# Altium PCB hub_usb.PcbDoc (part 1 of 2)
Units mm, origin at the board's own origin, x right, y up, seen from the top; angles counter-clockwise.
Board outline 68.09 x 80.66 mm, 4 copper layers (Top Layer 1, Top Layer, Bottom Layer, Bottom Layer 1), stack 0.603 mm thick; 101 components, 78 nets, 533 pads, 44 vias.
Unrouted connection lines stored in the file: 1.
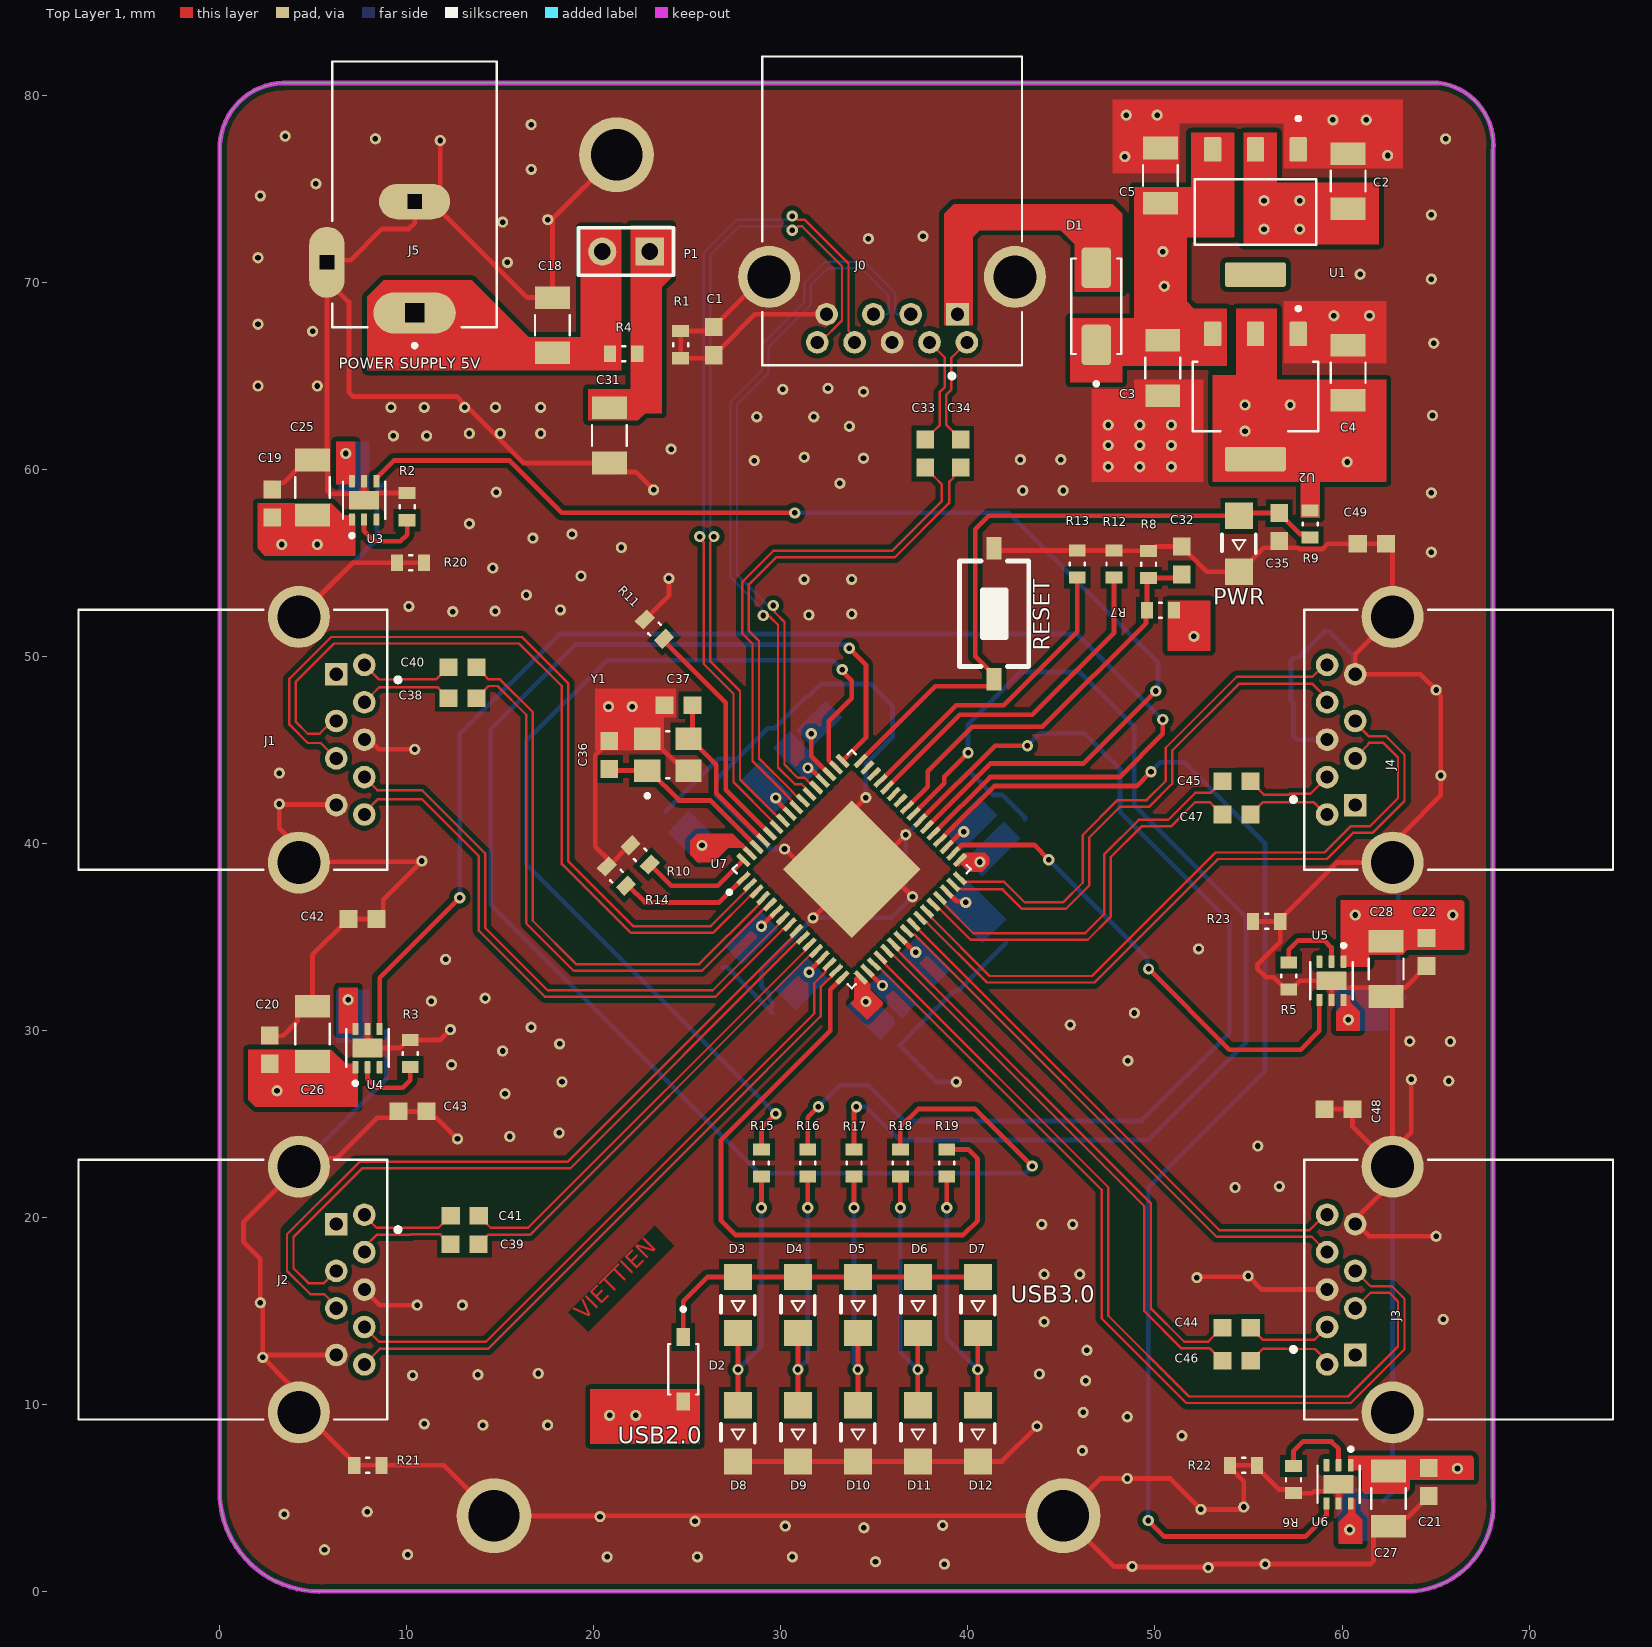
[diagram p0: Top Layer 1 view]
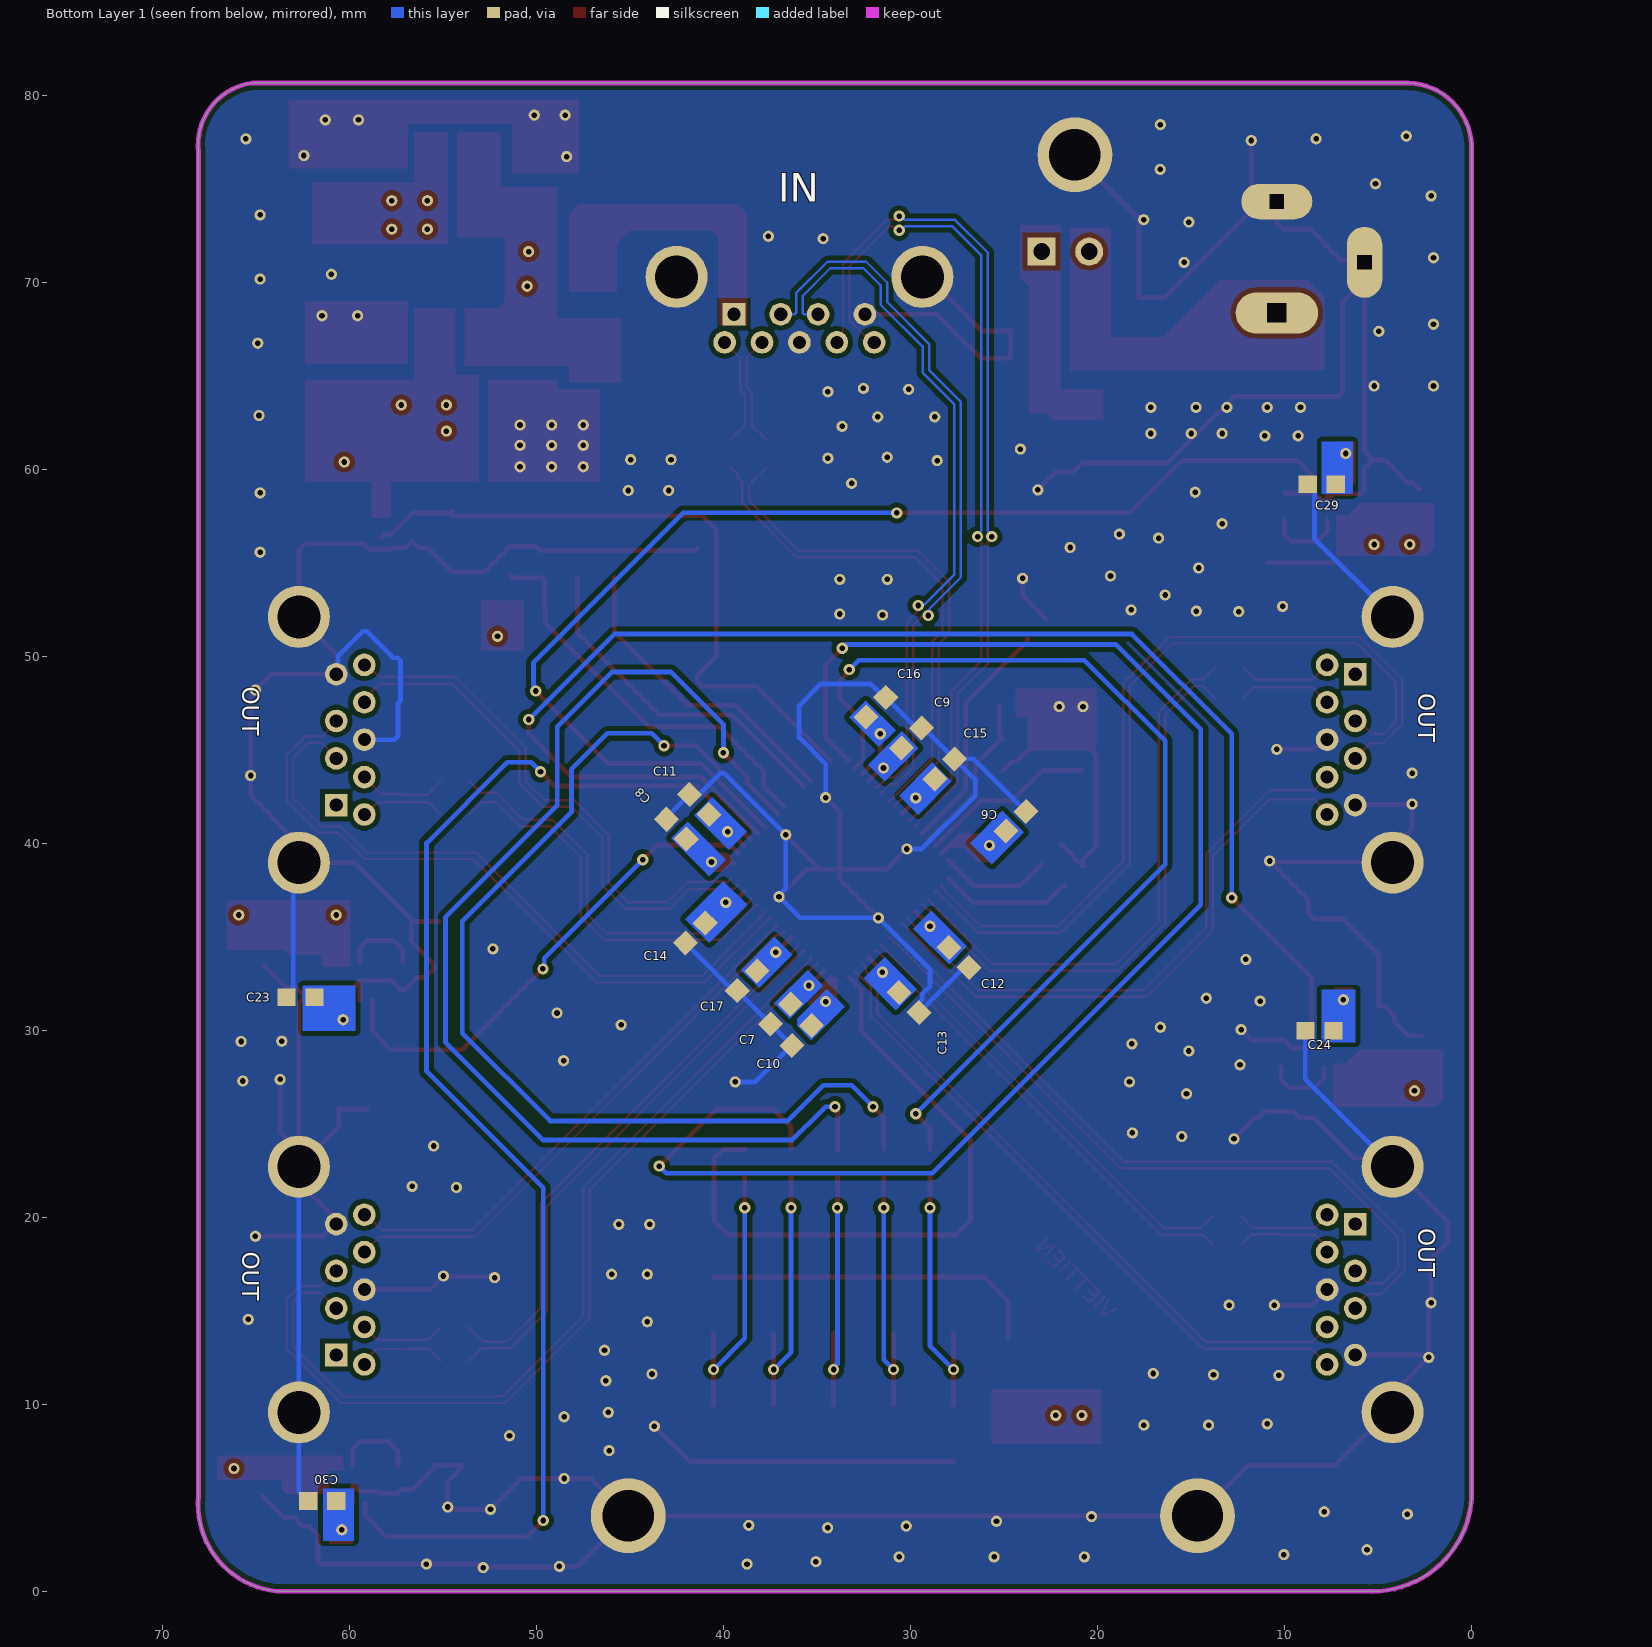
[diagram p1: Bottom Layer 1 view, seen from below]
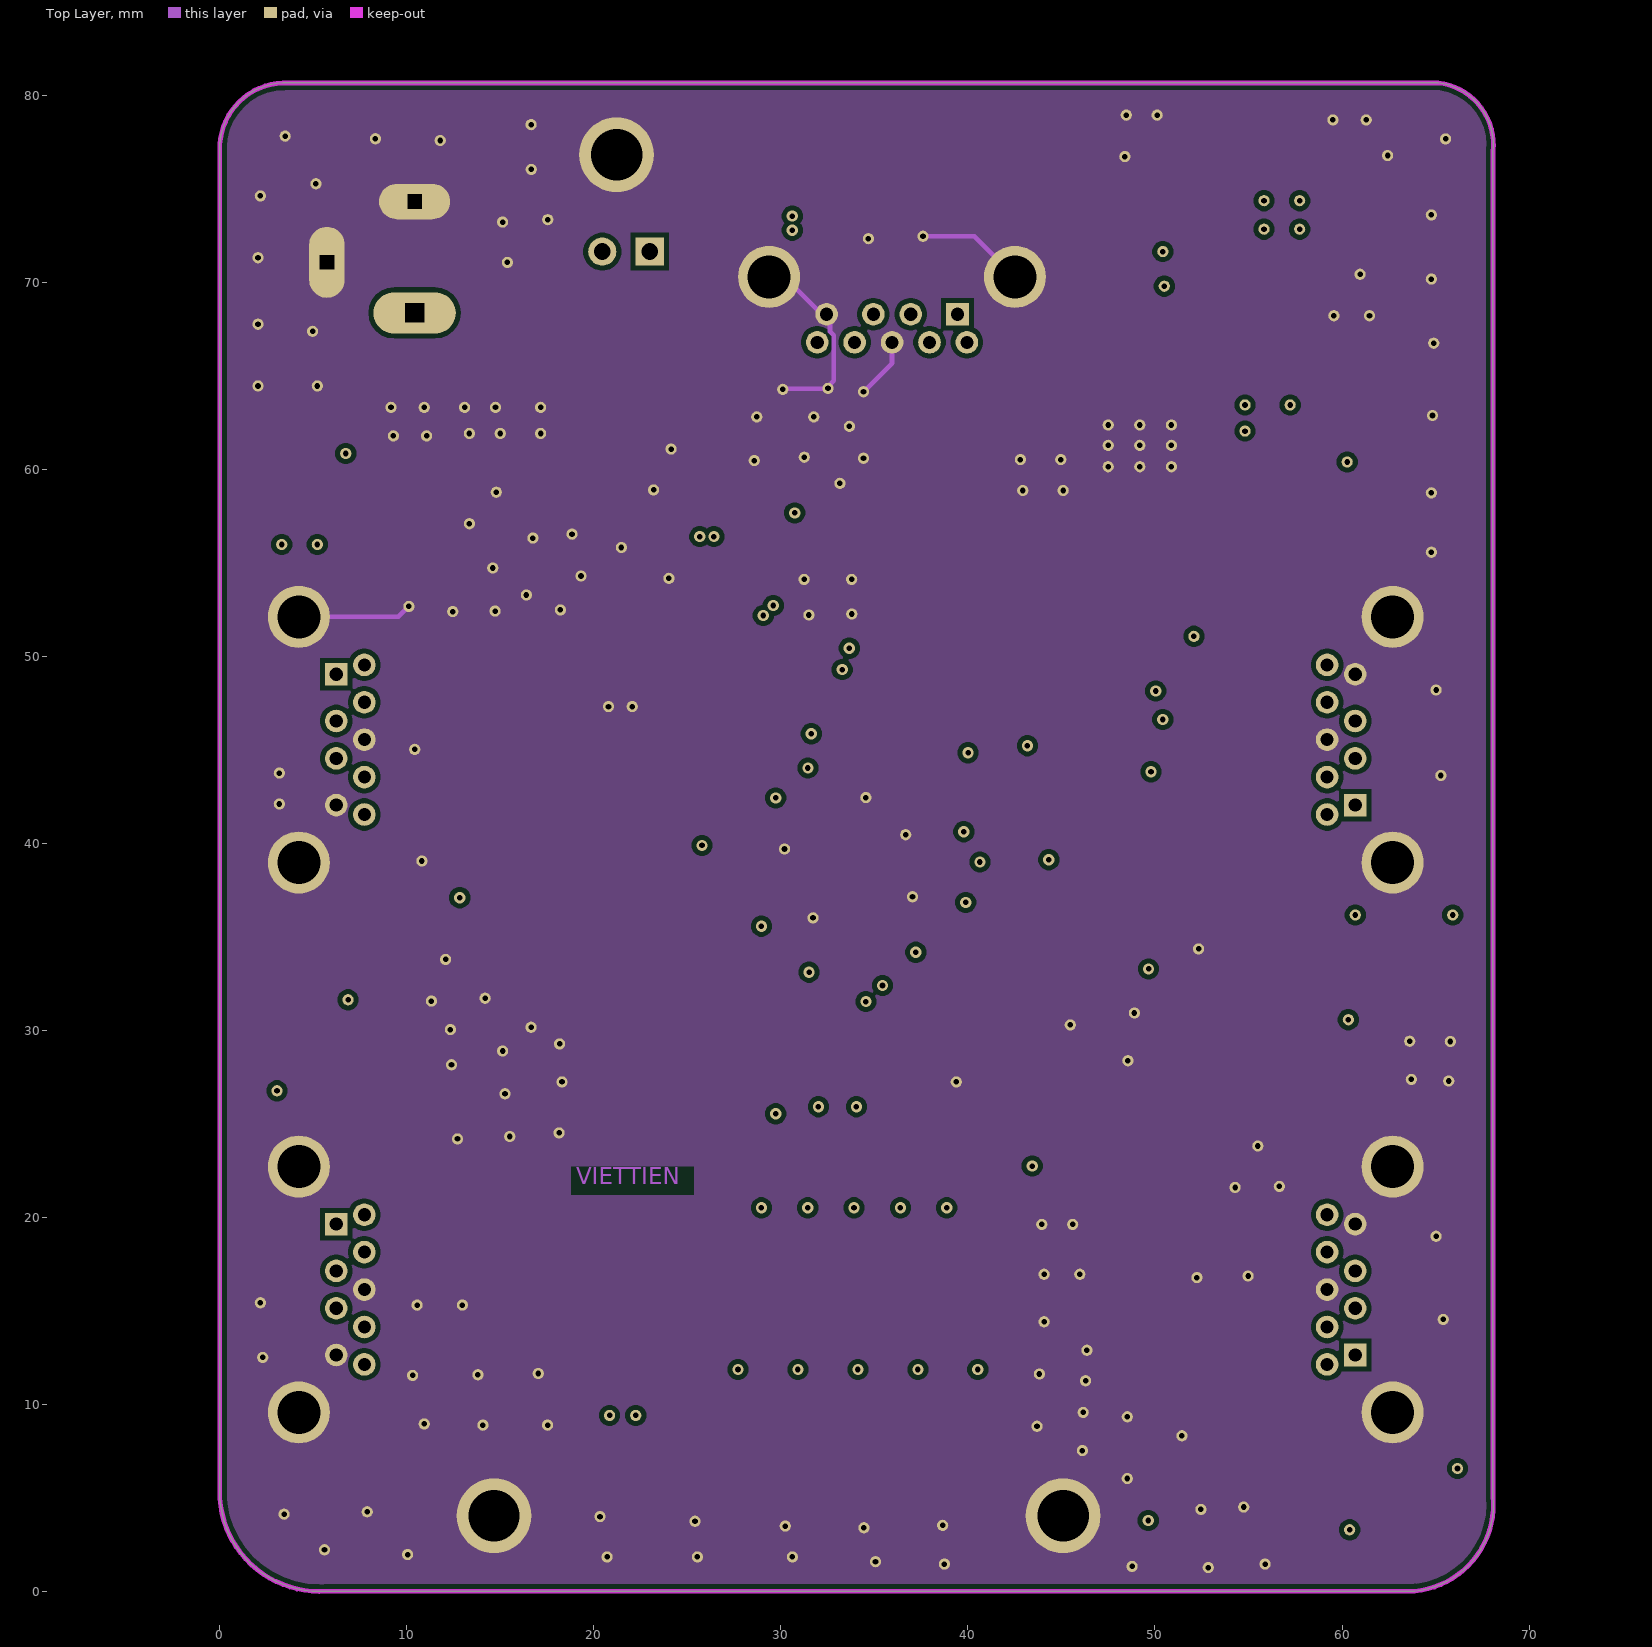
[diagram p2: Top Layer]
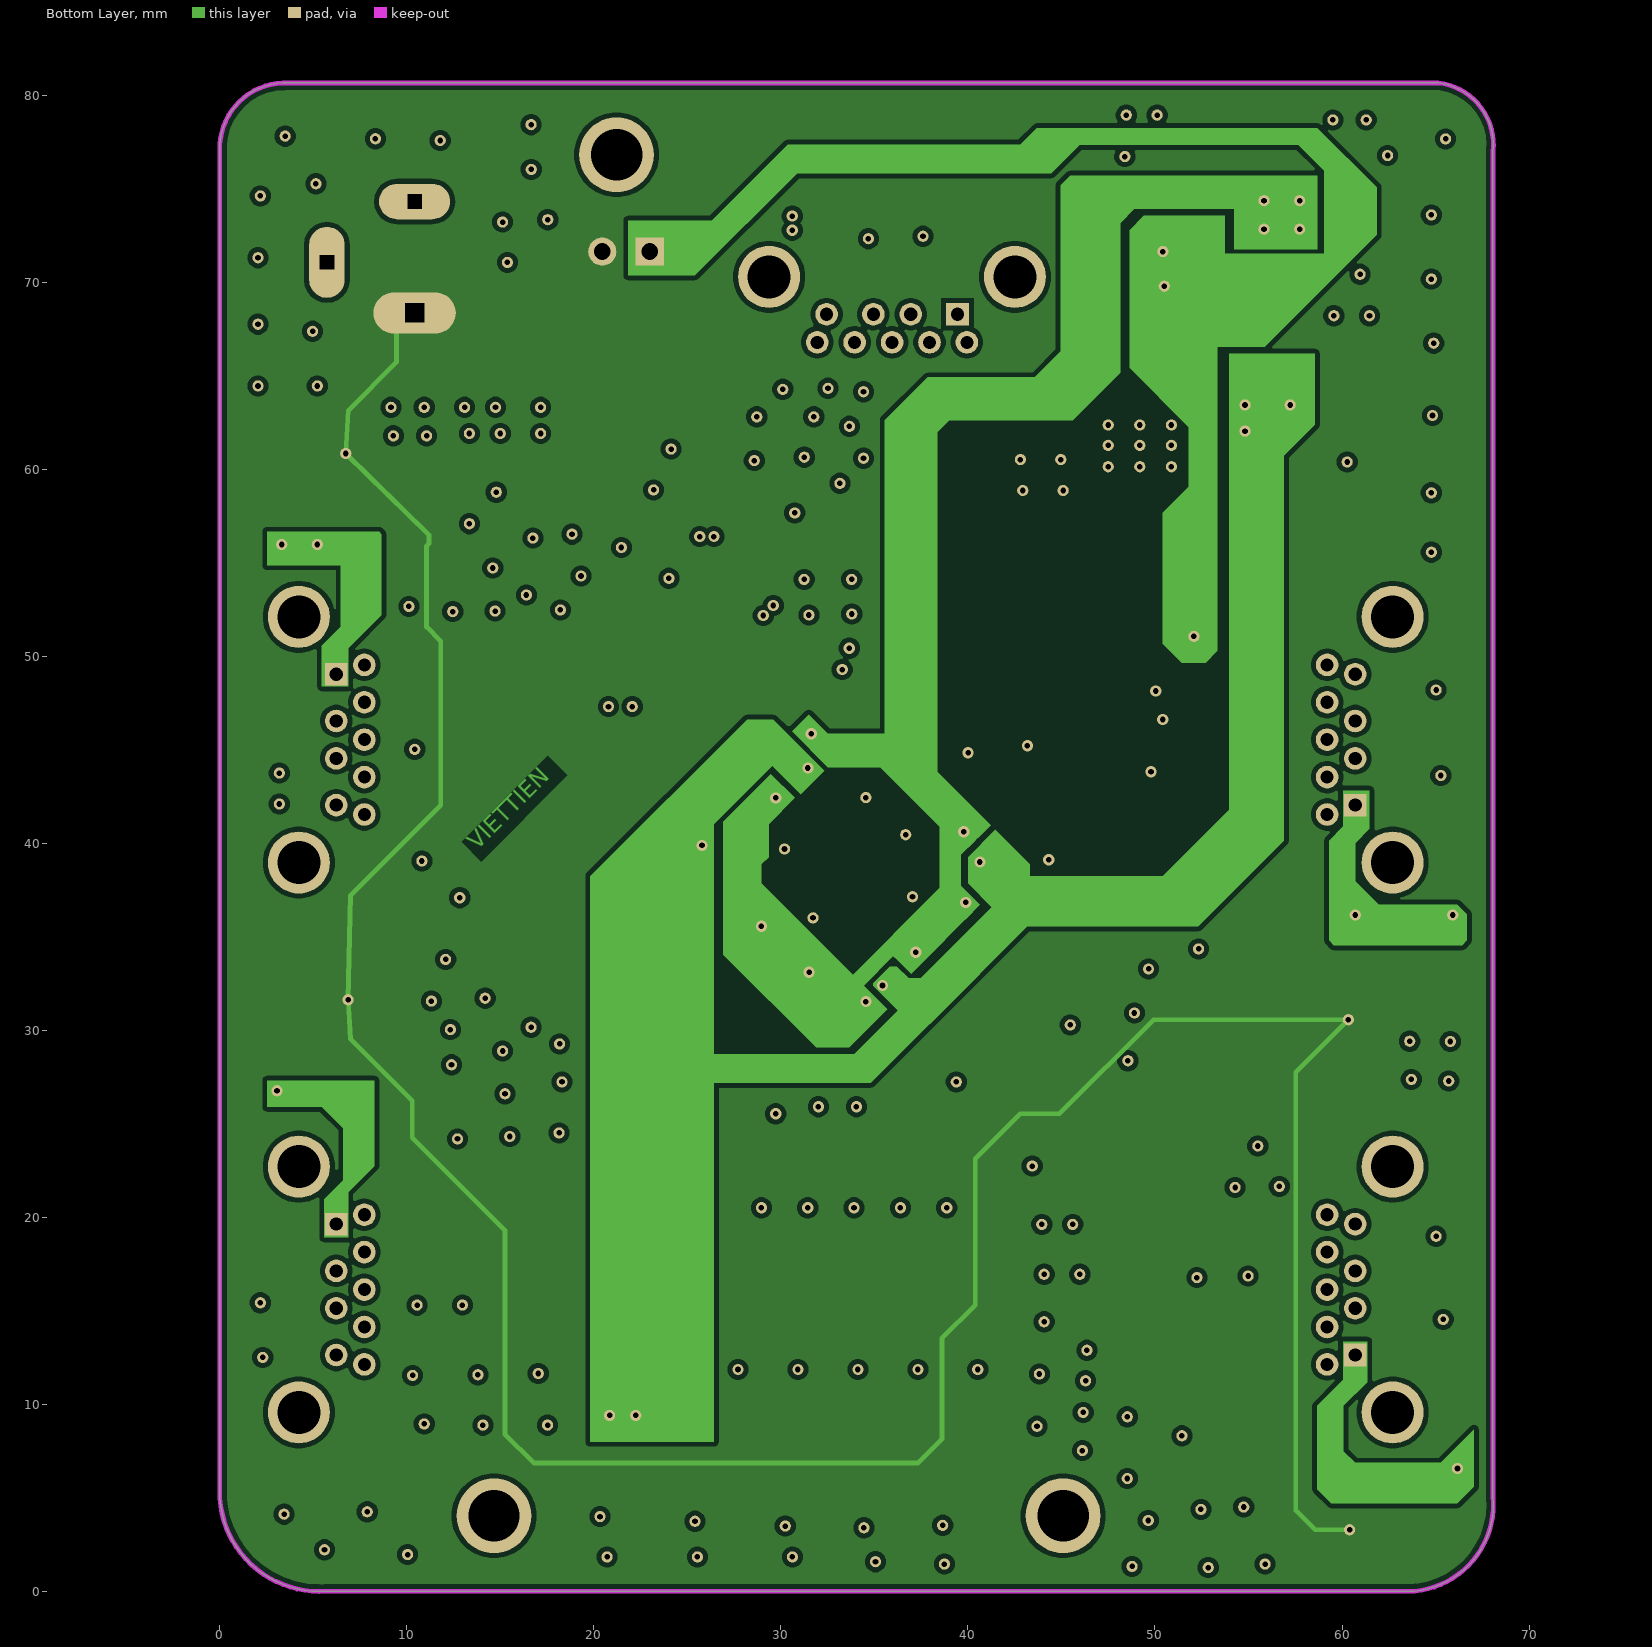
[diagram p3: Bottom Layer]
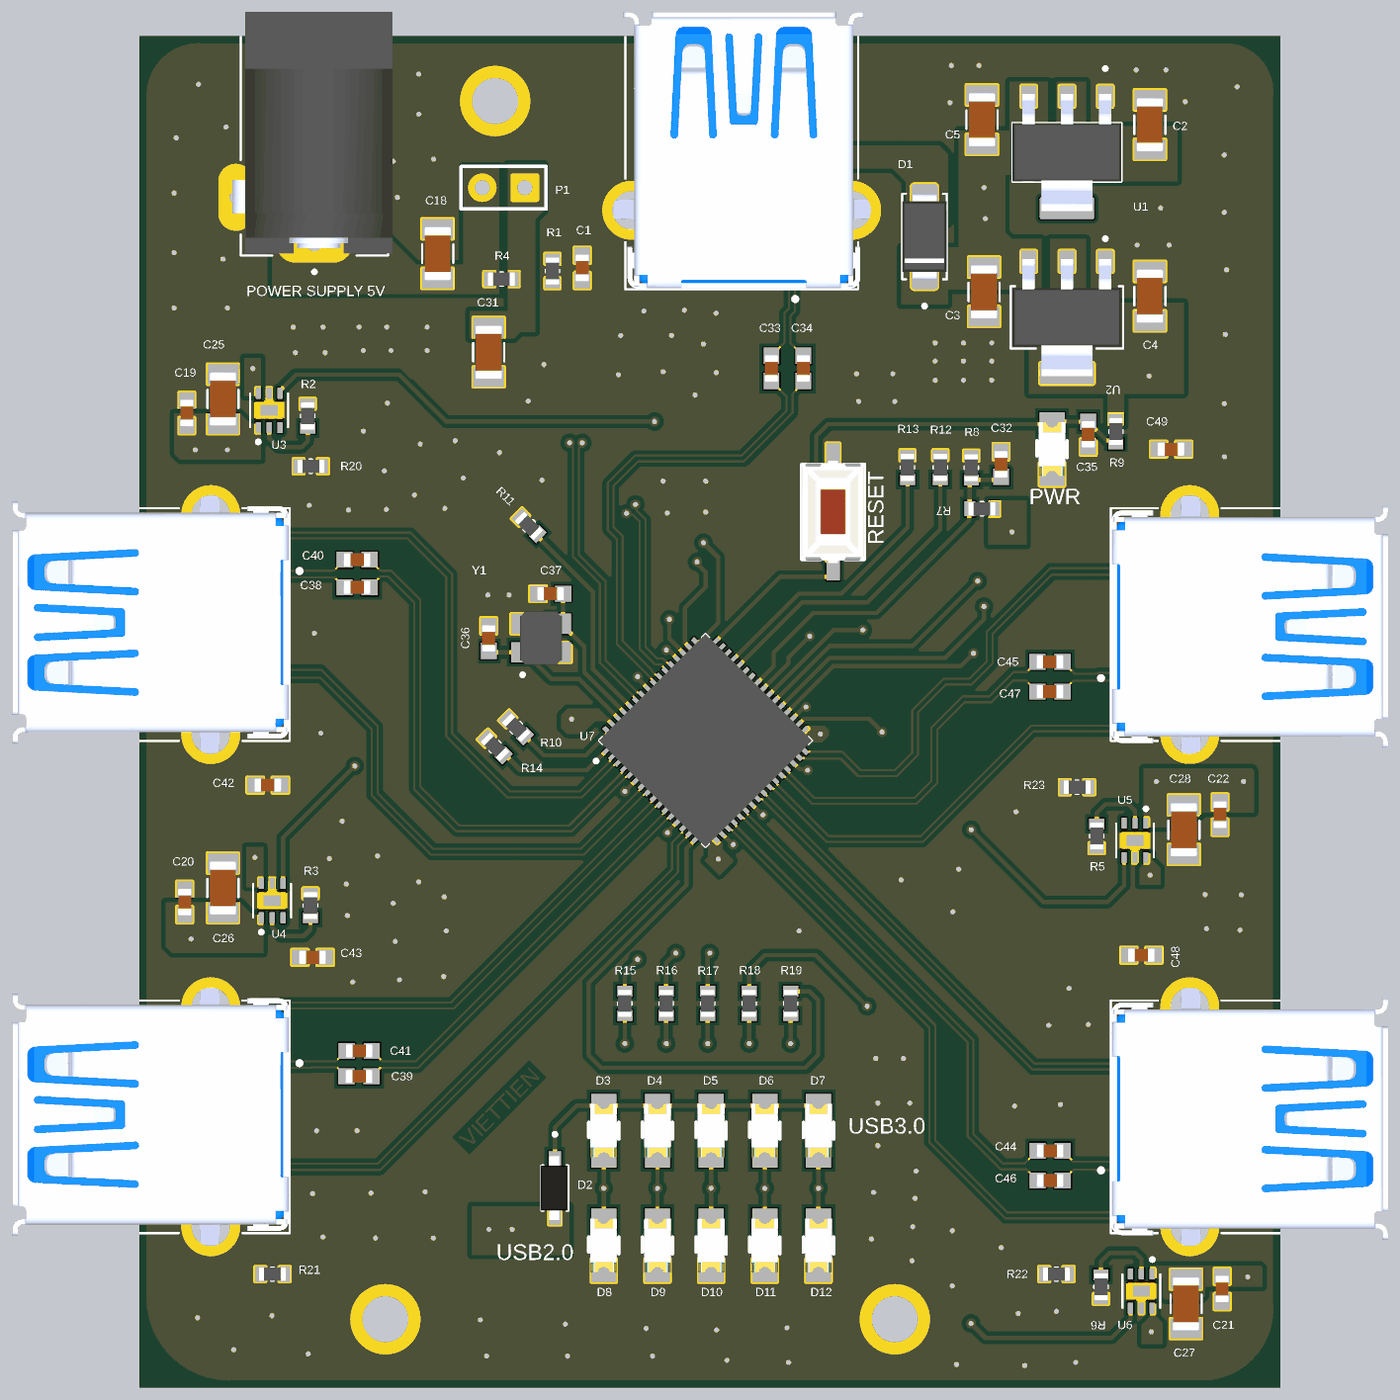
[diagram p5: 3D render of the assembled board from above, using the file's embedded part models]
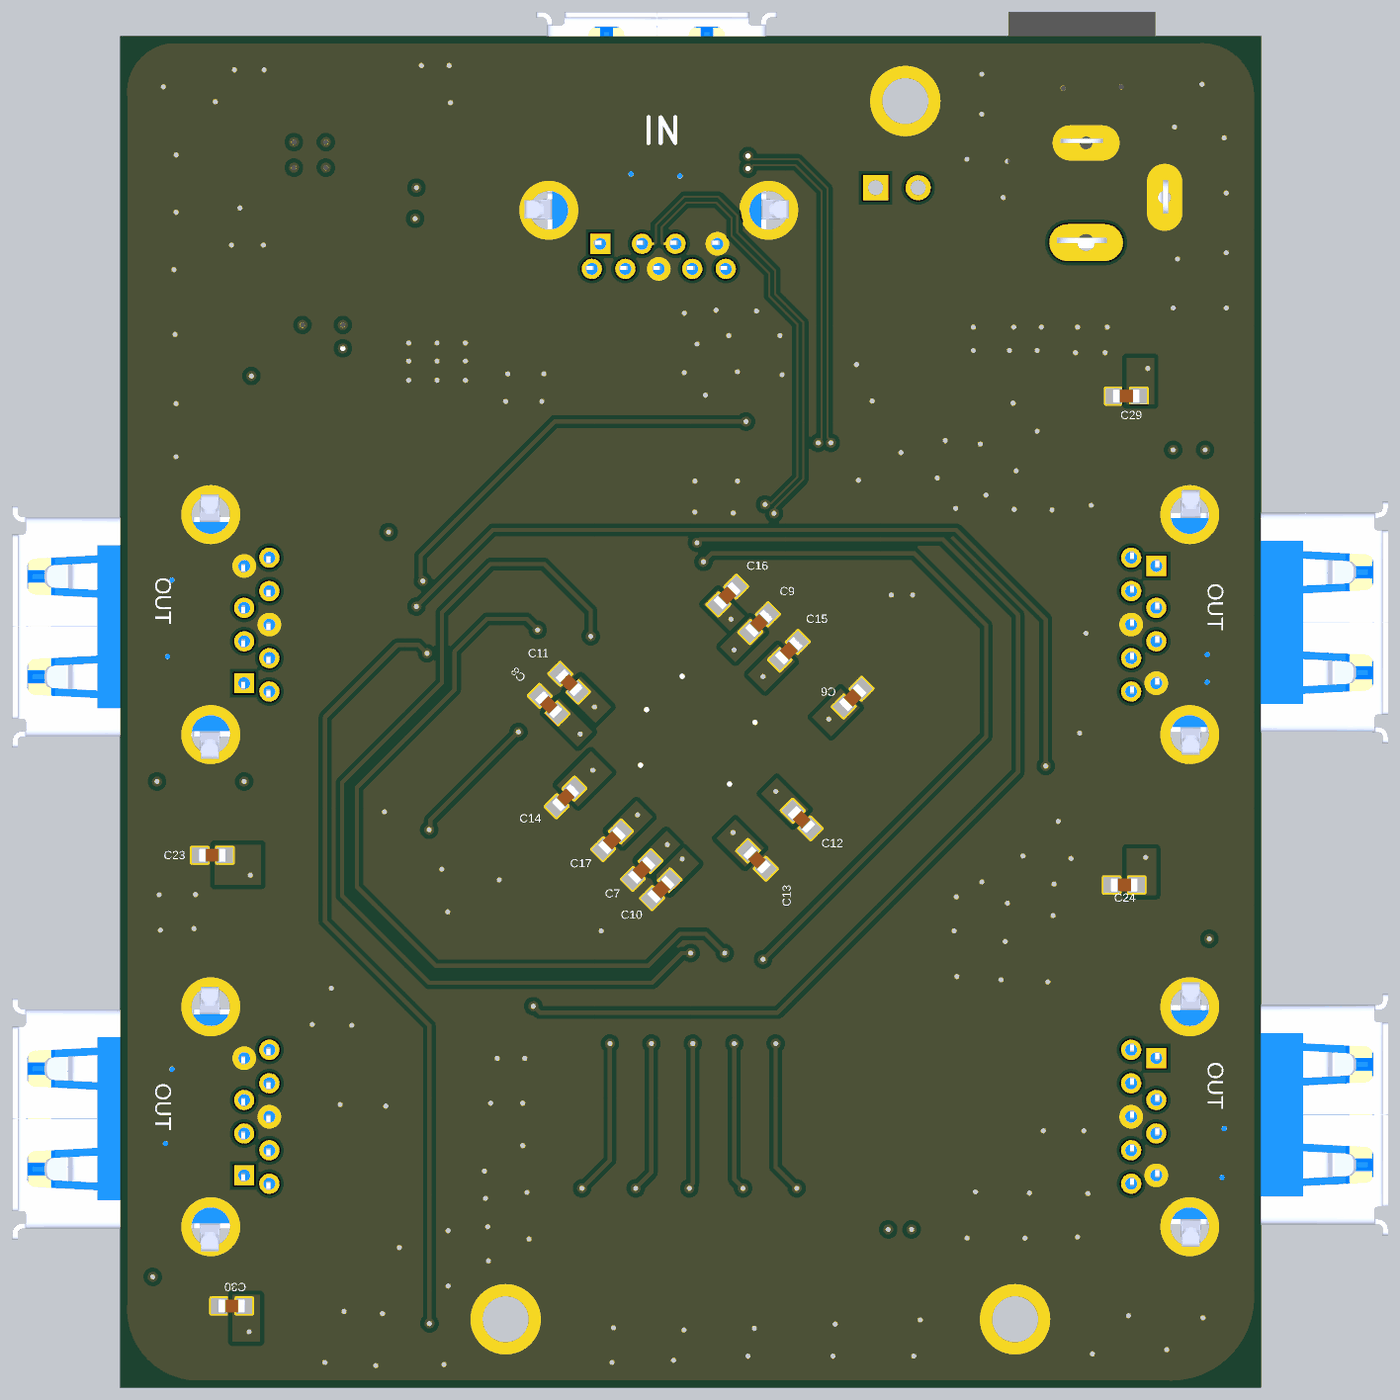
[diagram p6: 3D render of the assembled board from below, using the file's embedded part models]

## Layer stack, top to bottom
Top Solder: solder mask 0.0102, Solder Resist, Dk 3.5
Top Layer 1: signal copper 0.035
Dielectric 2: prepreg 0.0711, PP-006, Dk 4.1
Top Layer: signal copper 0.0356
Dielectric 1: dielectric 0.32, FR-4, Dk 4.8
Bottom Layer: signal copper 0.0356
Dielectric 3: prepreg 0.0711, PP-006, Dk 4.1
Bottom Layer 1: signal copper 0.035
Bottom Solder: solder mask 0.0102, Solder Resist, Dk 3.5

## Board outline
0,4.953 0,77.343 cw(c3.492,77.152) 3.683,80.645 65.151,80.645 cw(c64.77,77.343) 68.072,76.962 68.072,5.08 cw(c63.436,4.635) 63.881,0 5.715,0 cw(c5.334,5.334)

## Design rules (kind name [scope] priority, off if disabled: settings)
Clearance [All] p1: gap=0.254 ignorepadtopadclearanceinfootprint=FALSE except(0.154: Arc-Arc Arc-Track Arc-SMDPad Arc-THPad Arc-Via Arc-Text Arc-Hole Track-Track Track-SMDPad Track-THPad Track-Via Track-Text Track-Hole SMDPad-SMDPad SMDPad-THPad SMDPad-Via SMDPad-Text SMDPad-Hole THPad-THPad THPad-Via THPad-Text THPad-Hole Via-Via Via-Text Via-Hole Text-Text Text-Hole)
DiffPairsRouting [All] p1: maxlimit=0.22 minlimit=0.127 mostfreqgap=0.22 toplayer_mingap=0.22 toplayer_minwidth=0.128 toplayer_maxwidth=0.128 toplayer_prefwidth=0.128 midlayer1_maxgap=0.127 midlayer1_prefgap=0.127 midlayer1_minwidth=0.057 midlayer1_maxwidth=0.057 midlayer1_prefwidth=0.057 midlayer2_maxgap=0.127 midlayer2_prefgap=0.127 midlayer2_minwidth=0.057 midlayer2_maxwidth=0.057 midlayer2_prefwidth=0.057 bottomlayer_mingap=0.22 bottomlayer_minwidth=0.128 bottomlayer_maxwidth=0.128 bottomlayer_prefwidth=0.128 impedanceprofiledriven=TRUE impedanceprofileid={228387CE-696E-455D-860C-0F9EF146FFE7} impedanceprofilevalue=90.000000 maxuncoupledlength=12.7
HoleSize [All] p1: absolutevalues=TRUE maxlimit=10 minlimit=0.025 maxpercent=80.000 minpercent=20.000
MinimumSolderMaskSliver [All] p1: minsoldermaskwidth=0
PolygonConnect [All] p1: connectstyle=Direct reliefconductorwidth=0.254 reliefentries=4 polygonreliefangle="90 Angle" airgapwidth=0.254
RoutingVias [All] p1: holewidth=0.3 width=0.6 viastyle="Through Hole" minholewidth=0.3 minwidth=0.6 maxholewidth=0.3 maxwidth=0.6
SilkToSilkClearance [All] p1: silktosilkclearance=0.154
SilkToSolderMaskClearance [IsPad] p1: minsilkscreentomaskgap=0.154 clearancetoexposedcopper=TRUE
SolderMaskExpansion [All] p1: expansion=0.102 istentingtop=FALSE
Width [All] p1: maxlimit=0.254 minlimit=0.254 preferedwidth=0.254
25 further rules are at their usual default settings.

## Classes and differential pairs
component class vi_dieu_khien: C31 C32 C33 C34 C35 C36 C37 PWR R7 R8 R9 R10 R11 R12 R13 R14 R15 R16 R17 R18 R19 RESET U7 Y1
component class type_A_output: C38 C39 C40 C41 C42 C43 C44 C45 C46 C47 C48 C49 J1 J2 J3 J4 R20 R21 R22 R23
component class type_A_input: C1 D1 J0 R1
component class Nguon: C2 C3 C4 C5 C6 C7 C8 C9 C10 C11 C12 C13 C14 C15 C16 C17 C18 C19 C20 C21 C22 C23 C24 C25 C26 C27 C28 C29 C30 D2 D3 D4 D5 D6 D7 D8 D9 D10 D11 D12 J5 P1 R2 R3 R4 R5 R6 U1 U2 U3 U4 U5 U6
differential pair USB3UP_TX: +USB3UP_TX_P -USB3UP_TX_N
differential pair USB3UP_RX: +USB3UP_RX_P -USB3UP_RX_N
differential pair USB2UP_D: +USB2UP_D_P -USB2UP_D_N
differential pair UP_TX: +UP_TX_P -UP_TX_N
differential pair P4_TX: +P4_TX_P -P4_TX_N
differential pair P4_TX1: +P4_TX1_P -P4_TX1_N
differential pair P4_RX: +P4_RX_P -P4_RX_N
differential pair P4_D: +P4_D_P -P4_D_N
differential pair P3_TX: +P3_TX_P -P3_TX_N
differential pair P3_TX1: +P3_TX1_P -P3_TX1_N
differential pair P3_RX: +P3_RX_P -P3_RX_N
differential pair P3_D: +P3_D_P -P3_D_N
differential pair P2_TX: +P2_TX_P -P2_TX_N
differential pair P2_TX1: +P2_TX1_P -P2_TX1_N
differential pair P2_RX: +P2_RX_P -P2_RX_N
differential pair P2_D: +P2_D_P -P2_D_N
differential pair P1_TX: +P1_TX_P -P1_TX_N
differential pair P1_TX1: +P1_TX1_P -P1_TX1_N
differential pair P1_RX: +P1_RX_P -P1_RX_N
differential pair P1_D: +P1_D_P -P1_D_N

## Components (designator, comment, footprint, x,y, rotation, side; value= is the part's Value field where it differs from the comment)
C1 "0.1uF" CAPC1608X94N 26.416,66.837 r270 top
C2 "10uF" CAPC3216X170N 60.325,75.391 r270 top
C3 "10uF" CAPC3216X170N 50.419,65.405 r90 top
C4 "10uF" CAPC3216X170N 60.325,65.151 r270 top
C5 "10uF" CAPC3216X170N 50.292,75.692 r270 top
C6 "0.1uF" CAPC1608X94N 24.362,41.17 r315 bottom
C7 "0.1uF" CAPC1608X94N 36.957,30.861 r135 bottom
C8 "0.1uF" CAPC1608X94N 42.523,40.745 r225 bottom
C9 "0.1uF" CAPC1608X94N 29.95,45.615 r315 bottom
C10 "0.1uF" CAPC1608X94N 35.814,29.718 r135 bottom
C11 "0.1uF" CAPC1608X94N 41.297,42.059 r225 bottom
C12 "0.1uF" CAPC1608X94N 27.41,33.887 r45 bottom
C13 "0.1uF" CAPC1608X94N 30.077,31.474 r45 bottom
C14 "0.1uF" CAPC1608X94N 41.507,35.201 r315 bottom
C15 "0.1uF" CAPC1608X94N 28.172,43.964 r135 bottom
C16 "0.1uF" CAPC1608X94N 31.855,47.266 r135 bottom
C17 "0.1uF" CAPC1608X94N 38.735,32.639 r315 bottom
C18 "10uF" CAPC3216X170N 17.78,67.691 r270 top
C19 "0.1uF" CAPC1608X94N 2.794,58.166 r270 top
C20 "0.1uF" CAPC1608X94N 2.667,28.956 r270 top
C21 "0.1uF" CAPC1608X94N 64.643,5.842 r90 top
C22 "0.1uF" CAPC1608X94N 64.516,34.175 r90 top
C23 "0.1uF" CAPC1608X94N 62.611,31.75 r180 bottom
C24 "0.1uF" CAPC1608X94N 8.14,29.972 r180 bottom
C25 "10uF" CAPC3216X170N 4.953,59.008 r270 top
C26 "10uF" CAPC3216X170N 4.953,29.798 r270 top
C27 "10uF" CAPC3216X170N 62.484,4.953 r90 top
C28 "10uF" CAPC3216X170N 62.357,33.274 r90 top
C29 "0.1uF" CAPC1608X94N 8.013,59.182 r180 bottom
C30 "0.1uF" CAPC1608X94N 61.456,4.826 r180 bottom
C31 "2.2uF" CAPC3216X170N 20.828,61.802 r90 top
C32 "10nF" CAPC1608X94N 51.435,55.106 r270 top
C33 "0.1uF" CAPC1608X94N 37.719,60.833 r270 top
C34 "0.1uF" CAPC1608X94N 39.624,60.833 r270 top
C35 "0.1uF" CAPC1608X94N 56.642,56.896 r90 top
C36 "16pF" CAPC1608X94N 20.828,44.704 r270 top
C37 "16pF" CAPC1608X94N 24.523,47.371 r0 top
C38 "0.1uF" CAPC1608X94N 12.966,47.752 r180 top
C39 "0.1uF" CAPC1608X94N 13.081,18.542 r180 top
C40 "0.1uF" CAPC1608X94N 12.966,49.403 r180 top
C41 "0.1uF" CAPC1608X94N 13.093,20.066 r180 top
C42 "0.1uF" CAPC1608X94N 7.632,35.941 r0 top
C43 "0.1uF" CAPC1608X94N 10.299,25.654 r0 top
C44 "0.1uF" CAPC1608X94N 54.368,14.097 r0 top
C45 "0.1uF" CAPC1608X94N 54.356,43.307 r0 top
C46 "0.1uF" CAPC1608X94N 54.368,12.319 r0 top
C47 "0.1uF" CAPC1608X94N 54.356,41.529 r0 top
C48 "0.1uF" CAPC1608X94N 59.817,25.781 r180 top
C49 "0.1uF" CAPC1608X94N 61.595,56.007 r180 top
D1 "B340A-E3/61T" DIOM5126X229N 46.863,68.707 r90 top
D2 "1N4148W" SODFL3816X120N 24.78,11.871 r270 top
D3 "Blue" WL-SMCW_1206 27.701,15.3 r90 top
D4 "Blue" WL-SMCW_1206 30.908,15.3 r90 top
D5 "Blue" WL-SMCW_1206 34.115,15.3 r90 top
D6 "Blue" WL-SMCW_1206 37.322,15.3 r90 top
D7 "Blue" WL-SMCW_1206 40.528,15.3 r90 top
D8 "Yellow" WL-SMCW_1206 27.701,8.442 r90 top
D9 "Yellow" WL-SMCW_1206 30.908,8.442 r90 top
D10 "Yellow" WL-SMCW_1206 34.115,8.442 r90 top
D11 "Yellow" WL-SMCW_1206 37.322,8.442 r90 top
D12 "Yellow" WL-SMCW_1206 40.528,8.442 r90 top
J0 "USB_3.0_GSB311131HR" "USB 3.0" 35.941,68.278 r180 top
J1 "USB_3.0_GSB311131HR" "USB 3.0" 6.223,45.53 r270 top
J2 "USB_3.0_GSB311131HR" "USB 3.0" 6.223,16.129 r270 top
J3 "USB_3.0_GSB311131HR" "USB 3.0" 60.706,16.129 r90 top
J4 "USB_3.0_GSB311131HR" "USB 3.0" 60.706,45.53 r90 top
J5 "JACK_DC_2.1_EJ508A" MPD_EJ508A 10.414,71.054 r180 top
P1 "Header 2" HDR1X2 22.987,71.628 r180 top
PWR "RED" WL-SMCW_1206 54.483,56.007 r90 top
R1 "330R" RES_ERJU03J474V 24.638,66.652 r90 top
R2 "10K" RES_ERJU03J474V 10.014,57.992 r270 top
R3 "10K" RES_ERJU03J474V 10.179,28.749 r270 top
R4 "0R" RES_ERJU03J474V 21.59,66.167 r180 top
R5 "10K" RES_ERJU03J474V 57.15,32.893 r90 top
R6 "10K" RES_ERJU03J474V 57.404,5.969 r90 top
R7 "100K" RES_ERJU03J474V 50.292,52.451 r180 top
R8 "100K" RES_ERJU03J474V 49.657,54.901 r90 top
R9 "1K" RES_ERJU03J474V 58.293,57.06 r270 top
R10 "12K" RES_ERJU03J474V 22.474,39.375 r315 top
R11 "1K" RES_ERJU03J474V 23.236,51.44 r315 top
R12 "200K" RES_ERJU03J474V 47.805,54.921 r270 top
R13 "200K" RES_ERJU03J474V 45.847,54.921 r270 top
R14 "10K" RES_ERJU03J474V 21.204,38.232 r315 top
R15 "330R" RES_ERJU03J474V 28.956,22.897 r90 top
R16 "330R" RES_ERJU03J474V 31.432,22.897 r90 top
R17 "330R" RES_ERJU03J474V 33.909,22.897 r90 top
R18 "330R" RES_ERJU03J474V 36.386,22.897 r90 top
R19 "330R" RES_ERJU03J474V 38.862,22.897 r90 top
R20 "330R" RES_ERJU03J474V 10.197,54.991 r0 top
R21 "330R" RES_ERJU03J474V 7.911,6.731 r0 top
R22 "330R" RES_ERJU03J474V 54.737,6.731 r180 top
R23 "330R" RES_ERJU03J474V 55.97,35.814 r180 top
RESET "Nut Nhan 2 Chan SMD 3x6x2.5" PCBComponent_1 43.18,48.204 r90 top
U1 "AMS1117_1V2" AMS1117_1V2 55.372,73.744 r270 top
U2 "AMS1117" SOT229P700X180-4N 55.372,63.881 r270 top
U3 "AP2553AFDC-7" AP2553AFDC-7 7.713,58.327 r90 top
U4 "AP2553AFDC-7" AP2553AFDC-7 7.893,29.04 r90 top
U5 "AP2553AFDC-7" AP2553AFDC-7 59.436,32.639 r270 top
U6 "AP2553AFDC-7" AP2553AFDC-7 59.817,5.715 r270 top
U7 "USB5734-I/MR" USB5734-I/MR 33.782,38.608 r45 top
Y1 "25MHZ" XTAL_ABM8G-25.000MHZ-B4Y-T 23.957,44.728 r90 top

## Footprints (in the part's own frame and the unit in brackets; to place one, negate y for a bottom-side part, rotate by r counter-clockwise, add the part's x,y. Pads: shape width x height; smd on the part's side, far side on the other; paste and mask are expansions set on the pad)
AMS1117_1V2 [mm]
  rrect15% 1.31x0.93 smd: 1(-3.345,2.29) 2(-3.345,0) 3(-3.345,-2.29)
  rrect15% 1.31x3.24 smd: 4(3.345,0)
  silkscreen extent -5.1,-3.25 1.75,3.25, body extent -3.5,-3.25 3.5,3.25, height 1.8
AP2553AFDC-7 [mm]
  rrect25% 0.66x0.32 smd paste+0 mask+0.102: 1(-1.025,0.65) 2(-1.025,0) 3(-1.025,-0.65) 4(1.025,-0.65) 5(1.025,0) 6(1.025,0.65)
  rect 1x1.6 smd paste-2 mask+0.102: 7(0,0)
  silkscreen extent -1.98,-1.13 1,1.13
CAPC1608X94N [mm]
  rect 0.97x0.94 smd paste+0 mask+0.102: 1(-0.75,0) 2(0.75,0)
  body extent -0.8,-0.4 0.8,0.4, height 0.94
CAPC3216X170N [mm]
  rect 1.21x1.86 smd paste+0 mask+0.102: 1(-1.477,0) 2(1.477,0)
  silkscreen extent -0.55,-0.93 0.55,0.93, body extent -1.6,-0.8 1.6,0.8, height 1.7
DIOM5126X229N [mm]
  rrect25% 2.17x1.57 smd: A(2.065,0) C(-2.065,0)
  silkscreen extent -4.25,-1.33 2.55,1.33, body extent -2.55,-1.33 2.55,1.33, height 2.29
HDR1X2 [mm] "Connector; Header; 2 Position"
  rect 1.5x1.5 hole 0.9: 1(0,0)
  round 1.5 hole 0.9: 2(2.54,0)
  silkscreen extent -1.27,-1.27 3.81,1.27
MPD_EJ508A [mm]
  oval 4.4x2.2 hole 1.02 square: 1(0,2.705)
  oval 3.8x1.9 hole 0.76 square: 2(0,-3.25)
  oval 1.9x3.8 hole 0.76 square: 3(4.69,0)
  silkscreen extent -4.4,-10.74 4.4,4.55, body extent -4.65,-11.07 4.9,3.35, height 10.83
PCBComponent_1 [mm]
  rect 1.2x0.8 smd: 1(0.564,1.778) 2(7.564,1.778)
  silkscreen extent 1.24,-0.08 6.88,3.63, body extent 1.01,-0.07 7.11,3.63, height 2.5
RES_ERJU03J474V [mm]
  rect 0.65x0.9 smd: 1(-0.725,0) 2(0.725,0)
  silkscreen extent -0.08,-0.4 0.08,0.4, body extent -0.8,-0.4 0.8,0.4, height 0.45
SODFL3816X120N [mm]
  rect 0.97x0.73 smd paste+0 mask+0.102: A(1.72,0) C(-1.72,0)
  silkscreen extent -3.3,-0.8 1.35,0.8, body extent -1.9,-0.84 1.9,0.76, height 1.1
SOT229P700X180-4N [mm]
  rrect15% 1.31x0.93 smd: 1(-3.345,2.29) 2(-3.345,0) 3(-3.345,-2.29)
  rrect15% 1.31x3.24 smd: 2(3.345,0)
  silkscreen extent -4.8,-3.36 1.86,3.36, body extent -3.5,-3.25 3.5,3.25, height 1.8
USB5734-I/MR [mm]
  rrect25% 0.86x0.26 smd: 1(-4.435,3.75) 2(-4.435,3.25) 3(-4.435,2.75) 4(-4.435,2.25) 5(-4.435,1.75) 6(-4.435,1.25) 7(-4.435,0.75) 8(-4.435,0.25) 9(-4.435,-0.25) 10(-4.435,-0.75) 11(-4.435,-1.25) 12(-4.435,-1.75) 13(-4.435,-2.25) 14(-4.435,-2.75) 15(-4.435,-3.25) 16(-4.435,-3.75) 33(4.435,-3.75) 34(4.435,-3.25) 35(4.435,-2.75) 36(4.435,-2.25) 37(4.435,-1.75) 38(4.435,-1.25) 39(4.435,-0.75) 40(4.435,-0.25) 41(4.435,0.25) 42(4.435,0.75) 43(4.435,1.25) 44(4.435,1.75) 45(4.435,2.25) 46(4.435,2.75) 47(4.435,3.25) 48(4.435,3.75)
  rrect25% 0.26x0.86 smd: 17(-3.75,-4.435) 18(-3.25,-4.435) 19(-2.75,-4.435) 20(-2.25,-4.435) 21(-1.75,-4.435) 22(-1.25,-4.435) 23(-0.75,-4.435) 24(-0.25,-4.435) 25(0.25,-4.435) 26(0.75,-4.435) 27(1.25,-4.435) 28(1.75,-4.435) 29(2.25,-4.435) 30(2.75,-4.435) 31(3.25,-4.435) 32(3.75,-4.435) 49(3.75,4.435) 50(3.25,4.435) 51(2.75,4.435) 52(2.25,4.435) 53(1.75,4.435) 54(1.25,4.435) 55(0.75,4.435) 56(0.25,4.435) 57(-0.25,4.435) 58(-0.75,4.435) 59(-1.25,4.435) 60(-1.75,4.435) 61(-2.25,4.435) 62(-2.75,4.435) 63(-3.25,4.435) 64(-3.75,4.435)
  rect 5.2x5.2 smd paste-4: 65(0,0)
  silkscreen extent -5.59,-4.5 4.5,4.5, body extent -4.5,-4.5 4.5,4.5, height 0.85
"USB 3.0" [mm]
  rect 1.208x1.208 hole 0.7: 1(-3.5,0)
  round 1.208 hole 0.7: 2(-1,0) 3(1,0) 4(3.5,0) 5(4,1.5) 6(2,1.5) 7(0,1.5) 8(-2,1.5) 9(-4,1.5)
  round 3.316 hole 2.3: SH1(-6.57,-2) SH2(6.57,-2)
  silkscreen extent -6.95,-13.78 6.95,3.42, body extent -8.03,-13.84 7.78,2.66, height 7.57
WL-SMCW_1206 [mm]
  rect 1.4x1.5 smd: 1(-1.5,0) 2(1.5,0)
  silkscreen extent -0.5,-0.9 0.5,0.9, body extent -1.6,-0.8 1.6,0.8, height 0.68
XTAL_ABM8G-25.000MHZ-B4Y-T [mm]
  rect 1.2x1.4 smd: 1(-0.85,1.1) 2(-0.85,-1.1) 3(0.85,-1.1) 4(0.85,1.1)
  silkscreen extent -2.3,-0.08 1.25,1.2, body extent -1.6,-1.24 1.6,1.24, height 0.99

## Part data
C1 C6 C7 C8 C9 C10 C11 C12 C13 C14 C15 C16 C17 C19 C20 C21 C22 C23 C24 C29 C30 C32 C33 C34 C35 C36 C37 C38 C39 C40 C41 C42 C43 C44 C45 C46 C47 C48 C49: library part cap_0603_VJ0603D3R9DXCAP, "cap 0603 (1608 Metric)", Package="1608 Vishay Vitramon", Check_prices=https://www.snapeda.com/parts/VJ0603D3R9DXCAP/Vishay/view-part/?ref=eda, MF="Vishay Vitramon", MP=VJ0603D3R9DXCAP, SnapEDA_Link=https://www.snapeda.com/parts/VJ0603D3R9DXCAP/Vishay/view-part/?ref=snap
C2 C3 C4 C5 C18 C25 C26 C27 C28 C31: library part cap_1206_VJ1206A330JXCAP, "cap 1206 (3216 Metric)", Package="3216 Vishay Vitramon", Check_prices=https://www.snapeda.com/parts/VJ1206A330JXCAP/Vishay/view-part/?ref=eda, MF="Vishay Vitramon", MP=VJ1206A330JXCAP, SnapEDA_Link=https://www.snapeda.com/parts/VJ1206A330JXCAP/Vishay/view-part/?ref=snap
D1: "Diode Schottky 40 V 3A Surface Mount DO-214AC (SMA)", Package="DO-214 Vishay Semiconductor", Check_prices=https://www.snapeda.com/parts/B340A-E3/61T/Vishay/view-part/?ref=eda, MF="Vishay Semiconductor", MP=B340A-E3/61T, SnapEDA_Link=https://www.snapeda.com/parts/B340A-E3/61T/Vishay/view-part/?ref=snap
D2: "Small Signal Diode, SOD-123F, 100V, 0.15A, 150Â°C", Package="SOD-123F Diotec", Check_prices=https://www.snapeda.com/parts/1N4148W/Diotec/view-part/?ref=eda, MF="Diotec Semiconductor", MP=1N4148W, SnapEDA_Link=https://www.snapeda.com/parts/1N4148W/Diotec/view-part/?ref=snap
D3 D4 D5 D6 D7: library part WL-SMCW_1206, "1206, Blue Typ.(@20mA): 470nm, 145mcd, 3.2V, 140Â° InGaN", Package="1206 Wurth Electronics", Check_prices=https://www.snapeda.com/parts/150120BS75000/Wurth+Electronics/view-part/?ref=eda, MF="Wurth Electronics", MP=150120BS75000, SnapEDA_Link=https://www.snapeda.com/parts/150120BS75000/Wurth+Electronics/view-part/?ref=snap
D8 D9 D10 D11 D12: library part WL-SMCW_1206, "1206,  Yellow Typ.(@20mA): 470nm, 145mcd, 3.2V, 140Â° InGaN", Package="1206 Wurth Electronics", Check_prices=https://www.snapeda.com/parts/150120BS75000/Wurth+Electronics/view-part/?ref=eda, MF="Wurth Electronics", MP=150120BS75000, SnapEDA_Link=https://www.snapeda.com/parts/150120BS75000/Wurth+Electronics/view-part/?ref=snap
J0 J1 J2 J3 J4: "USB-A _USB TYPE-A_ USB 3.0 _USB 3.1 Gen 1, Superspeed_ Receptacle Connector 9 Position Through Hole, Right Angle / GSB311131HR", Package=None, Digi-Key_Part_Number=GSB311131HR-ND, Digi-Key_Purchase_URL=https://www.digikey.ru/product-detail/en/amphenol-icc-commercial-products/GSB311131HR/GSB311131HR-ND/2187173?utm_source=snapeda&utm_medium=aggregator&utm_campaign=symbol, MF="Amphenol ICC", MP=GSB311131HR, SnapEDA_Link=https://www.snapeda.com/parts/GSB311131HR/Amphenol%20FCI/view-part/229215/?ref=snap
J5: "Power Barrel Connector Jack 2.10mm ID _0.083_, 5.50mm OD _0.217_ Through Hole, Right Angle / EJ508A", Package="Non-Standard MPD", Availability=Unavailable, MF=MPD, MP=EJ508A, Price=None, SnapEDA_Link=https://www.snapeda.com/parts/EJ508A/MPD%20%28Memory%20Protection%20Devices%29/view-part/474399/?ref=snap
P1: "Header, 2-Pin", LatestRevisionDate=17-Jul-2002, LatestRevisionNote="Re-released for DXP Platform.", Publisher="Altium Limited"
PWR: library part WL-SMCW_1206, "1206, RED Typ.(@20mA): 470nm, 145mcd, 3.2V, 140Â° InGaN", Package="1206 Wurth Electronics", Check_prices=https://www.snapeda.com/parts/150120BS75000/Wurth+Electronics/view-part/?ref=eda, MF="Wurth Electronics", MP=150120BS75000, SnapEDA_Link=https://www.snapeda.com/parts/150120BS75000/Wurth+Electronics/view-part/?ref=snap
R1 R2 R3 R4 R5 R6 R7 R8 R9 R10 R11 R12 R13 R14 R15 R16 R17 R18 R19 R20 R21 R22 R23: library part res_0603_ERJU03J474V, "0603 Anti-Sulfurated", Package="1608-2 Panasonic", Check_prices=https://www.snapeda.com/parts/ERJU03J474V/Panasonic/view-part/?ref=eda, MF=Panasonic, MP=ERJU03J474V, SnapEDA_Link=https://www.snapeda.com/parts/ERJU03J474V/Panasonic/view-part/?ref=snap
U2: "1A LOW DROPOUT VOLTAGE REGULATOR SOT-223", Package="SOT-223 Seeed Technology", Check_prices=https://www.snapeda.com/parts/AMS1117/Advanced+Monolithic+Systems/view-part/?ref=eda, MF="Advanced Monolithic Systems", MP=AMS1117, SnapEDA_Link=https://www.snapeda.com/parts/AMS1117/Advanced+Monolithic+Systems/view-part/?ref=snap
U7: "USB5734-I/MR / USB Hub Controller USB 3.0 I2C, SPI, UART Interface 64-VQFN (9x9)"
Y1: library part Thach_anh_3.2x2.5_ABM8G-25.000MHZ-B4Y-T, "25 MHz Â±30ppm Crystal 10pF 60 Ohms 4-SMD, No Lead / ABM8G-25.000MHZ-B4Y-T", Package="SMD-4 Abracon", Availability="In Stock", Check_prices=https://www.snapeda.com/parts/ABM8G-25.000MHZ-B4Y-T/Abracon+LLC/view-part/?ref=eda, MF=Abracon, MP=ABM8G-25.000MHZ-B4Y-T, Price=None, Purchase-URL=https://pricing.snapeda.com/search/part/ABM8G-25.000MHZ-B4Y-T/?ref=eda, SnapEDA_Link=https://www.snapeda.com/parts/ABM8G-25.000MHZ-B4Y-T/Abracon+LLC/view-part/?ref=snap
RESET: Ma_Hang=MH001036, Ten="Nút Nhấn 2 Chân 3x6x2.5MM SMD"

## Free pads (board coordinates)
  round 0.6 hole 0.3 mask+0.102: 3(2.038,64.444) 3(2.038,67.746) 3(2.038,71.302) 3(2.165,15.422) 3(2.165,74.604) 3(2.292,12.501) 3(3.053,26.757) 3(3.181,42.092) 3(3.181,43.743) 3(3.307,55.967) 3(3.435,4.119) 3(3.493,77.801) 3(4.959,67.365) 3(5.136,75.255) 3(5.212,55.967) 3(5.213,64.444) 3(5.594,2.214) 3(6.731,60.833) 3(6.858,31.623) 3(7.88,4.246) 3(8.316,77.66) 3(9.15,63.301) 3(9.277,61.777) 3(10.039,1.96) 3(10.106,52.655) 3(10.307,11.54) 3(10.42,45.013) 3(10.547,15.295) 3(10.801,39.044) 3(10.928,8.945) 3(10.928,63.301) 3(11.055,61.777) 3(11.309,31.551) 3(11.781,77.567) 3(12.072,33.781) 3(12.325,30.027) 3(12.385,28.147) 3(12.452,52.379) 3(12.706,24.185) 3(12.967,15.298) 3(13.087,63.301) 3(13.341,57.078) 3(13.341,61.904) 3(13.799,11.574) 3(14.065,8.88) 3(14.185,31.707) 3(14.593,54.712) 3(14.718,52.406) 3(14.738,63.301) 3(14.78,58.762) 3(14.992,61.904) 3(15.119,28.884) 3(15.119,73.207) 3(15.246,26.598) 3(15.373,71.048) 3(15.5,24.312) 3(16.389,53.268) 3(16.643,30.154) 3(16.643,78.414) 3(16.651,76.021) 3(16.736,56.311) 3(17.024,11.64) 3(17.151,61.904) 3(17.151,63.301) 3(17.523,8.88) 3(17.532,73.334) 3(18.137,24.508) 3(18.167,29.265) 3(18.207,52.469) 3(18.294,27.233) 3(18.83,56.519) 3(19.31,54.284) 3(20.326,3.992) 3(20.707,1.833) 3(20.779,47.299) 3(20.84,9.399) 3(21.469,55.808) 3(22.049,47.299) 3(22.237,9.399) 3(23.192,58.887) 3(24.009,54.157) 3(24.127,61.068) 3(25.406,3.738) 3(25.533,1.833) 3(28.575,60.452) 3(28.708,62.793) 3(30.099,64.262) 3(30.193,39.687) 3(30.232,3.484) 3(30.613,1.833) 3(31.242,54.102) 3(31.248,60.634) 3(31.496,52.197) 3(31.717,36.004) 3(31.756,62.793) 3(32.518,64.317) 3(33.153,59.237) 3(33.661,62.285) 3(33.782,54.102) 3(33.788,52.252) 3(34.417,60.579) 3(34.417,64.135) 3(34.435,3.392) 3(34.54,42.436) 3(34.677,72.318) 3(35.058,1.579) 3(36.67,40.449) 3(37.032,37.132) 3(37.598,72.445) 3(38.647,3.522) 3(38.741,1.452) 3(39.376,27.233) 3(42.805,60.507) 3(42.932,58.856) 3(43.694,8.818) 3(43.821,11.612) 3(43.948,19.613) 3(44.075,14.406) 3(44.075,16.946) 3(44.964,60.507) 3(45.091,58.856) 3(45.472,30.281) 3(45.599,19.613) 3(45.98,16.946) 3(46.117,7.518) 3(46.161,9.559) 3(46.291,11.253) 3(46.361,12.882) 3(47.498,60.126) 3(47.498,61.269) 3(47.498,62.357) 3(48.387,76.708) 3(48.465,78.922) 3(48.52,6.024) 3(48.52,9.326) 3(48.549,28.364) 3(48.774,1.325) 3(48.901,30.916) 3(49.188,60.126) 3(49.188,61.269) 3(49.188,62.357) 3(50.116,78.922) 3(50.419,71.628) 3(50.497,69.778) 3(50.878,60.126) 3(50.878,61.269) 3(50.878,62.357) 3(51.441,8.31) 3(52.082,51.055) 3(52.241,16.769) 3(52.33,34.345) 3(52.457,4.373) 3(52.849,1.264) 3(54.282,21.589) 3(54.743,4.5) 3(54.815,62.031) 3(54.815,63.428) 3(54.977,16.855) 3(55.498,23.804) 3(55.831,72.826) 3(55.831,74.35) 3(55.886,1.452) 3(56.648,21.645) 3(57.228,63.428) 3(57.736,72.826) 3(57.736,74.35) 3(59.514,78.668) 3(59.563,68.199) 3(60.276,60.38) 3(60.339,30.559) 3(60.409,3.284) 3(60.711,36.155) 3(60.966,70.413) 3(61.292,78.668) 3(61.468,68.199) 3(62.435,76.763) 3(63.619,29.407) 3(63.706,27.365) 3(64.776,55.554) 3(64.776,58.729) 3(64.776,70.159) 3(64.776,73.588) 3(64.837,62.863) 3(64.903,66.73) 3(65.03,18.978) 3(65.03,48.188) 3(65.284,43.616) 3(65.411,14.533) 3(65.538,77.652) 3(65.704,27.279) 3(65.792,29.392) 3(65.918,36.155) 3(66.172,6.564)
  round 4 hole 2.75: 19(14.658,4.033) 19(21.213,76.804) 19(45.089,4.033)

## Via types
v1: diameter 0.6, hole 0.3, Top Layer 1 to Bottom Layer 1, tented both sides, 44 vias

## Nets (pads, with @x,y where several pads share a name; then routed paths per layer and width w, separated by ;. In a path a pad name is that pad's centre, name@x,y a point inside that pad or via, vN(x,y) a via of type N, cw(c..) or ccw(c..) an arc to the next point about the centre after c; other vN are vias at no path point)
1V2: C2.2 C10.2 C11.2 C12.2 C13.2 C14.1 C15.1 C16.1 C17.1 pad.3@55.831,72.826 pad.3@55.831,74.35 pad.3@57.736,72.826 pad.3@57.736,74.35 U1.2 U7.6 U7.13 U7.17 U7.23 U7.30 U7.35 U7.51 U7.57 | length 11.1
  Top Layer 1 w0.254: v1(28.956,35.56) 29.438,36.042 29.444,36.042 29.758,36.356 U7.6@29.762,36.356 ; v1(29.718,42.418) 29.784,42.352 29.784,42.252 U7.57@30.469,41.567 ; v1(31.504,33.101) 31.504,33.148 U7.13@32.237,33.881 ; v1(31.623,45.847) 31.623,44.656 U7.51@32.591,43.689 ; U7.17@34.266,32.82 34.266,32.816 34.671,32.411 34.671,32.004 34.544,31.877 v1(34.543,31.528) ; U7.23@36.388,34.942 36.6,34.73 36.604,34.73 U7.23@36.647,34.686 ; U7.23@36.648,34.686 37.172,34.163 v1(37.211,34.163) ; U7.30@38.863,37.417 38.867,37.417 39.387,36.896 39.812,36.896 v1(39.878,36.83) ; U7.35@38.863,39.799 39.608,40.545 39.714,40.545 v1(39.78,40.611)
3V3: C4.2 C6.2 C7.2 C8.2 C9.2 D2.A pad.3@20.84,9.399 pad.3@22.237,9.399 pad.3@54.815,62.031 pad.3@54.815,63.428 pad.3@57.228,63.428 pad.3@60.276,60.38 R9.1 U2.2 U7.18 U7.33 U7.52 U7.63 | length 12
  Top Layer 1 w0.254: v1(25.781,39.878) 25.847,39.812 26.349,39.812 26.409,39.751 26.589,39.751 26.716,39.878 27.912,39.878 28.132,39.658 28.136,39.658 U7.63@28.348,39.446 ; v1(31.442,44.015) 31.508,43.949 31.623,43.949 U7.52@32.237,43.335 ; U7.18@34.62,33.174 34.624,33.174 35.413,32.385 v1(35.433,32.385) ; U7.33@39.57,39.092 39.782,39.305 40.231,39.305 40.546,38.989 v1(40.64,38.989) ; U2.2@55.372,60.536 55.415,60.579 58.166,60.579 58.293,60.452 R9.1@58.293,57.785
EXT_5V0: C18.2 C23.2 C24.2 C29.2 C30.2 J5.1 P1.2 pad.3@6.731,60.833 pad.3@6.858,31.623 pad.3@60.339,30.559 pad.3@60.409,3.284 R4.2 U3.6 U4.6 U5.6 U6.6 | length 163.1
  Bottom Layer w0.254: J5.1@10.414,68.349 10.34,68.349 9.441,67.45 9.441,65.707 6.863,63.129 pad.3@6.731,60.833 11.176,56.48 11.176,56.007 11.049,55.88 11.049,51.562 11.811,50.8 11.811,42.037 6.99,37.216 pad.3@6.858,31.623 6.99,29.522 10.287,26.225 10.287,24.257 15.24,19.304 15.24,8.404 16.786,6.858 37.338,6.858 38.608,8.128 38.608,13.525 40.386,15.303 40.386,23.114 42.799,25.527 44.89,25.527 49.922,30.559 pad.3@60.339,30.559 57.531,27.75 57.531,4.318 58.565,3.284 pad.3@60.409,3.284